# Altium PCB NB2DSK01.PcbDoc (part 15 of 17)
Units mil, origin at the board's own origin, x right, y up, seen from the top; angles counter-clockwise.
Board outline 11815 x 6500.03 mil, 8 copper layers (Top Layer, MidLayer1, MidLayer2, GND, PWR, MidLayer3, MidLayer4, Bottom Layer), stack 74.62 mil thick; 798 components, 1002 nets, 3927 pads, 3182 vias.
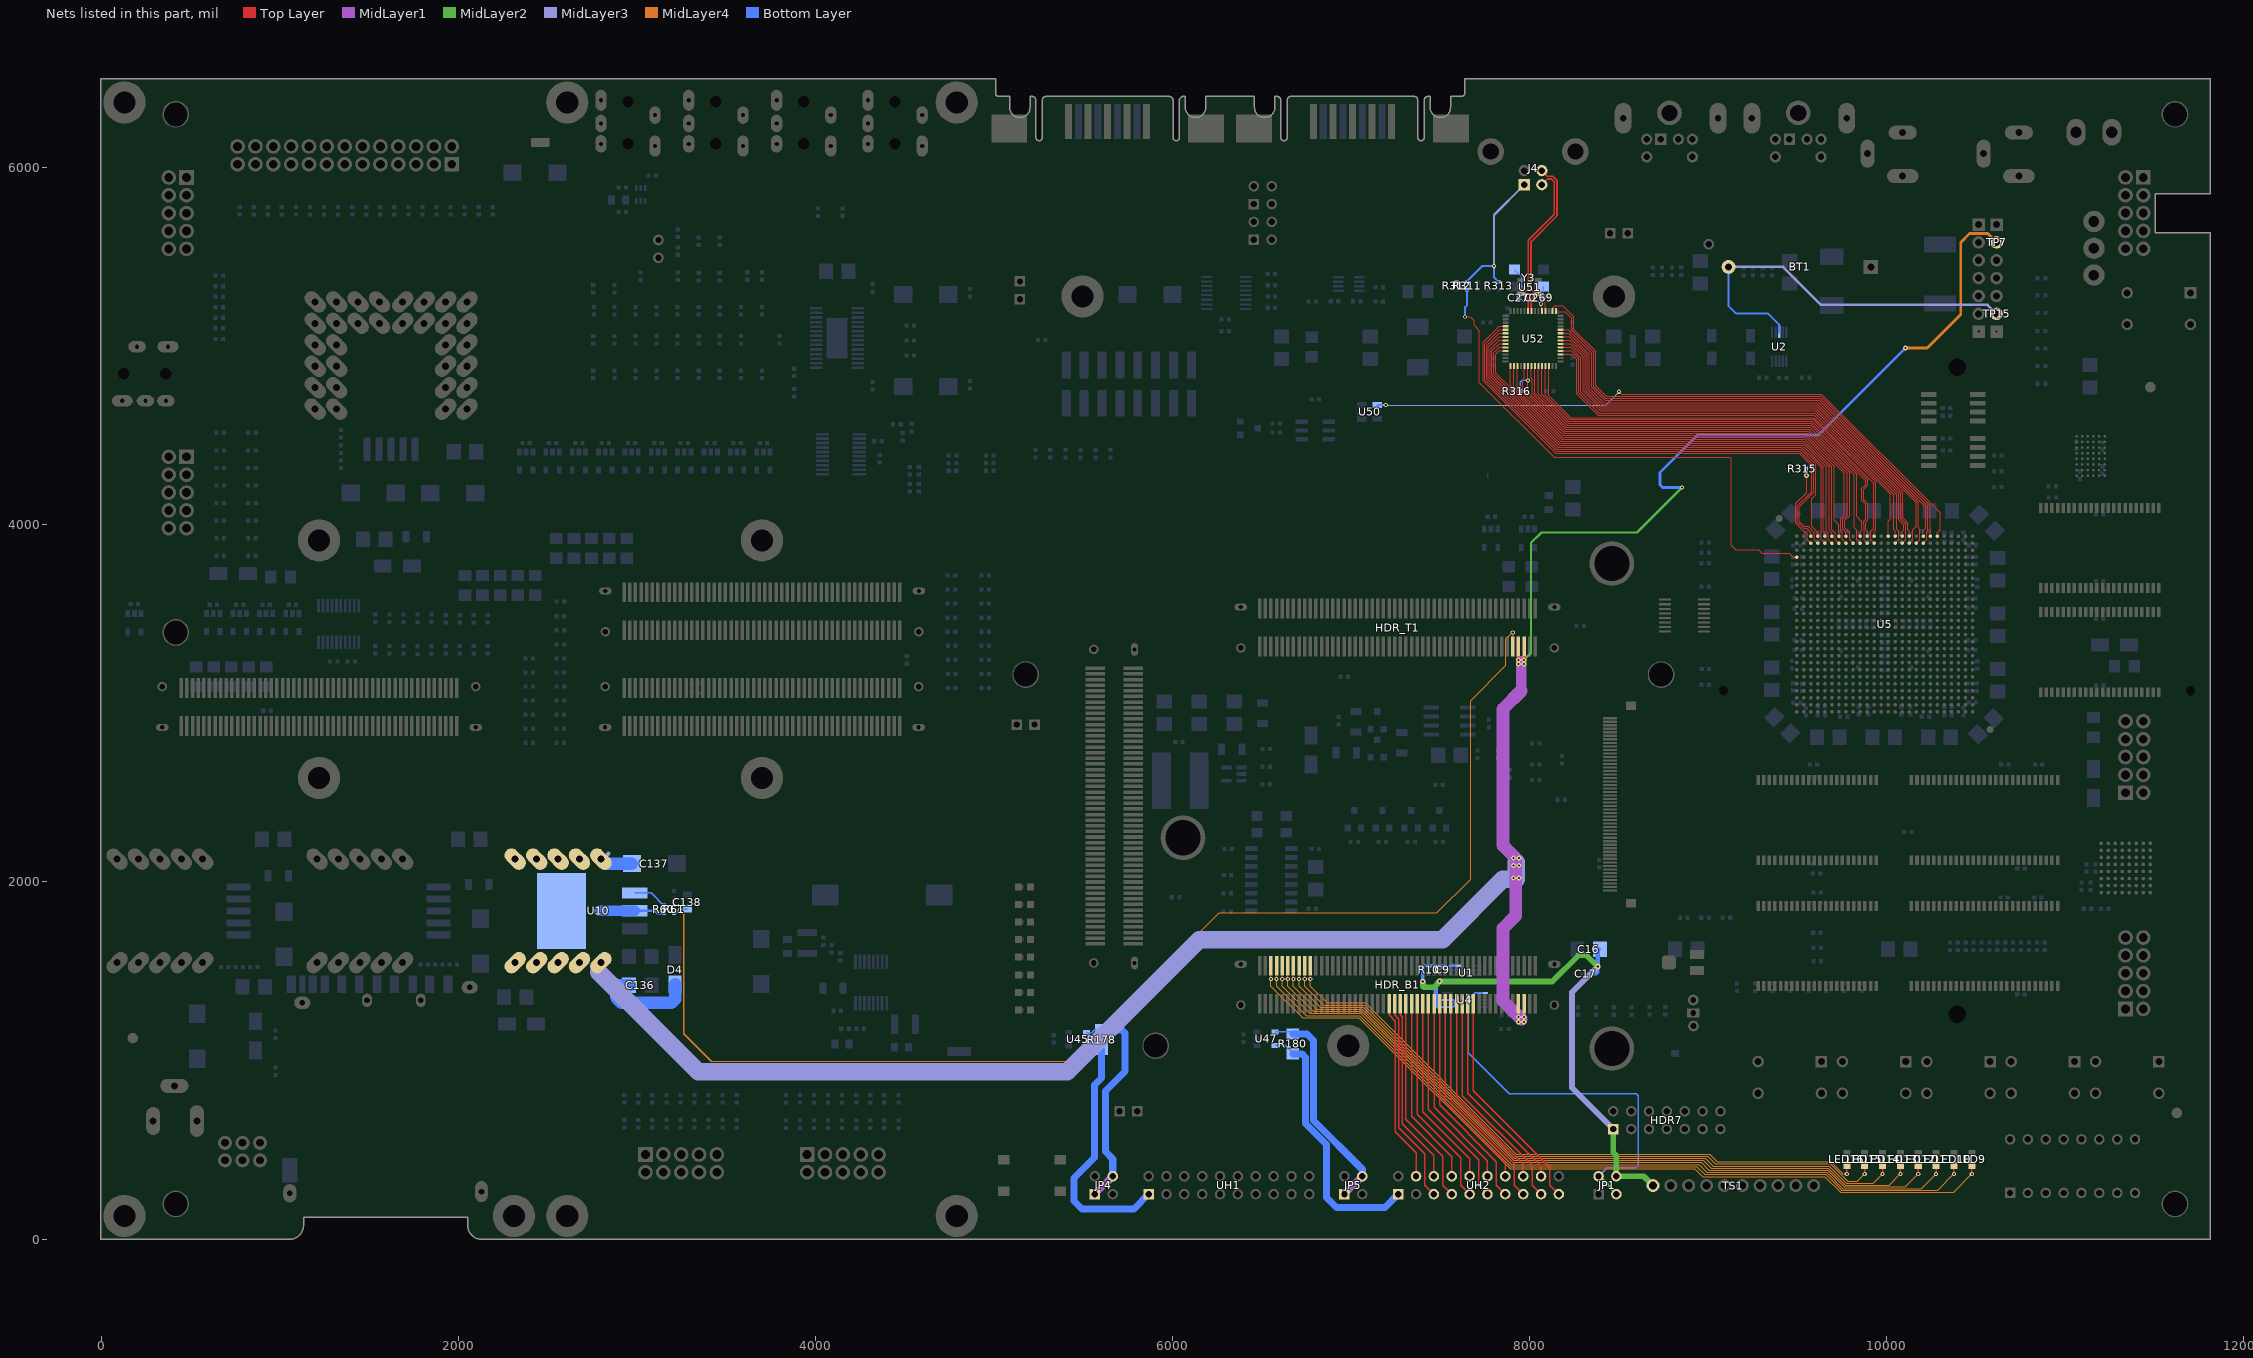
[diagram p21: the nets of this part, all layers, seen from the top]

## Via types
v1: diameter 23.62, hole 11.81, Top Layer to Bottom Layer, tented both sides, 1950 vias
v2: diameter 27.56, hole 11.81, Top Layer to Bottom Layer, tented both sides, 679 vias
v3: diameter 23.62, hole 11.81, Top Layer to Bottom Layer, 194 vias
v4: diameter 31.5, hole 11.81, Top Layer to Bottom Layer, tented both sides, 178 vias
v5: diameter 21.65, hole 11.81, Top Layer to Bottom Layer, tented both sides, 67 vias
v6: diameter 23.62, hole 11.81, Top Layer to Bottom Layer, tented bottom, 53 vias
v7: diameter 26, hole 11.81, Top Layer to Bottom Layer, tented both sides, 21 vias
v8: diameter 26, hole 11.81, Top Layer to Bottom Layer, 13 vias
v9: diameter 28, hole 11.81, Top Layer to Bottom Layer, 8 vias
v10: diameter 25.59, hole 11.81, Top Layer to Bottom Layer, tented both sides, 7 vias
v11: diameter 39.37, hole 11.81, Top Layer to Bottom Layer, tented both sides, 5 vias
v12: diameter 30, hole 11.81, Top Layer to Bottom Layer, 3 vias
v13: diameter 30, hole 11.81, Top Layer to Bottom Layer, tented both sides, 2 vias
v14: diameter 23, hole 11.81, Top Layer to Bottom Layer, tented both sides, 1 vias
v15: diameter 26.56, hole 11.81, Top Layer to Bottom Layer, tented both sides, 1 vias

## Nets (pads, with @x,y where several pads share a name; then routed paths per layer and width w, separated by ;. In a path a pad name is that pad's centre, name@x,y a point inside that pad or via, vN(x,y) a via of type N, cw(c..) or ccw(c..) an arc to the next point about the centre after c; other vN are vias at no path point) (continued)
UIO.IO20: HDR_B1.47 UH2.4 | length 1029.5
  Top Layer w7.87: HDR_B1.47@7212.6,1318.9 7212.6,1255.91 7248.03,1220.47 7248.03,600.19 7363.78,484.44 UH2.4@7363.78,351.97
UIO.IO21: HDR_B1.49 UH2.5 | length 1157.9
  Top Layer w7.87: HDR_B1.49@7244.09,1318.9 7244.09,1255.91 7267.72,1232.28 7267.72,623.82 7413.78,477.75 7413.78,301.97 UH2.5@7463.78,251.97
UIO.IO22: HDR_B1.51 UH2.6 | length 1044.9
  Top Layer w7.87: HDR_B1.51@7275.59,1318.9 7275.59,1255.91 7287.4,1244.1 7287.4,647.44 7463.78,471.06 UH2.6@7463.78,351.97
UIO.IO23: HDR_B1.53 UH2.7 | length 1173.3
  Top Layer w7.87: HDR_B1.53@7307.09,1318.9 7307.09,671.06 7513.78,464.37 7513.78,301.97 UH2.7@7563.78,251.97
UIO.IO24: HDR_B1.55 UH2.8 | length 1060.2
  Top Layer w7.87: HDR_B1.55@7338.58,1318.9 7338.58,686.81 7563.78,461.61 UH2.8@7563.78,351.97
UIO.IO25: HDR_B1.57 UH2.9 | length 1188.6
  Top Layer w7.87: HDR_B1.57@7370.08,1318.9 7370.08,699.85 7613.78,456.15 7613.78,301.97 UH2.9@7663.78,251.97
UIO.IO26: HDR_B1.59 UH2.10 | length 1075.5
  Top Layer w7.87: HDR_B1.59@7401.58,1318.9 7401.58,712.9 7663.78,450.7 UH2.10@7663.78,351.97
UIO.IO27: HDR_B1.61 UH2.11 | length 1203.9
  Top Layer w7.87: HDR_B1.61@7433.07,1318.9 7433.07,725.95 7713.78,445.24 7713.78,301.97 UH2.11@7763.78,251.97
UIO.IO28: HDR_B1.63 UH2.12 | length 1090.9
  Top Layer w7.87: HDR_B1.63@7464.57,1318.9 7464.57,738.99 7763.78,439.78 UH2.12@7763.78,351.97
UIO.IO29: HDR_B1.65 UH2.13 | length 1219.2
  Top Layer w7.87: HDR_B1.65@7496.06,1318.9 7496.06,752.04 7813.78,434.32 7813.78,301.97 UH2.13@7863.78,251.97
UIO.IO30: HDR_B1.67 UH2.14 | length 1106.2
  Top Layer w7.87: HDR_B1.67@7527.56,1318.9 7527.56,765.08 7863.78,428.86 UH2.14@7863.78,351.97
UIO.IO31: HDR_B1.69 UH2.15 | length 1234.6
  Top Layer w7.87: HDR_B1.69@7559.06,1318.9 7559.06,778.13 7913.78,423.41 7913.78,301.97 UH2.15@7963.78,251.97
UIO.IO32: HDR_B1.71 UH2.16 | length 1121.5
  Top Layer w7.87: HDR_B1.71@7590.55,1318.9 7590.55,791.18 7774.45,607.27 7963.78,417.95 UH2.16@7963.78,351.97
UIO.IO33: HDR_B1.73 UH2.17 | length 1249.9
  Top Layer w7.87: HDR_B1.73@7622.05,1318.9 7622.05,804.22 8013.78,412.49 8013.78,301.97 UH2.17@8063.78,251.97
UIO.IO34: HDR_B1.75 UH2.18 | length 1136.9
  Top Layer w7.87: HDR_B1.75@7653.54,1318.9 7653.54,817.27 8063.78,407.03 UH2.18@8063.78,351.97
UIO.IO35: HDR_B1.77 UH2.19 | length 1265.8
  Top Layer w7.87: HDR_B1.77@7685.04,1318.9 7685.04,830.32 8113.78,401.58 8113.78,401.18 ; 8114.17,401.58 8113.78,401.18 ; UH2.19@8163.78,251.97 8113.78,301.97 8113.78,401.18
USB#.DMINUS: J4.2 U51.6 U52.9 | length 889.6
  Top Layer w9.84: U51.6@7968.5,5288.39 7992.13,5264.76 7992.13,5218.37 7990.16,5216.4 U52.9@7990.15,5197.78 U52.9@7990.16,5193.9 ; U51.6@7968.5,5296.26 7992.13,5319.88 7992.13,5593.34 8137.8,5739.01 8137.8,5921.26 8122.05,5937.01 8100,5937.01 J4.2@8068.11,5905.12
USB#.DPLUS: J4.3 U51.1 U52.8 | length 915.5
  Top Layer w9.84: U52.8@8009.84,5193.9 U52.8@8009.84,5197.78 8009.84,5216.4 8007.97,5218.27 8007.97,5264.86 U51.1@8031.5,5288.39 ; U51.1@8031.5,5296.26 8007.97,5319.78 8007.97,5586.71 8153.69,5732.43 8153.69,5927.84 8128.77,5952.76 8099.21,5952.76 J4.3@8068.11,5983.86
USB#.VBUS: J4.1 R311.2 R313.1 | length 816.6
  MidLayer3 w11.81: v1(7800,5448.82) 7800,5735.43 J4.1@7969.69,5905.12
  Bottom Layer w11.81: R311.2@7651.56,5359.75 7651.56,5367.38 7733,5448.82 v1(7800,5448.82) 7800,5386.78 R313.1@7827.02,5359.75
USB.D0: U5.A3 U52.18 | length 2886.5
  Top Layer w5: U52.18@7869.09,5112.2 7865.35,5112.2 7828.74,5112.2 7739,5022.46 7739,4808.25 8146.35,4400.9 9508.55,4400.9 9578.74,4330.71 9578.74,4184.74 9500,4106 9500,4014.14 9533.83,3980.32 9551.18,3980.32 9574.8,3956.69 U5.A3@9574.8,3937.01
USB.D1: U5.B4 U52.19 | length 2919
  Top Layer w5: U52.19@7869.09,5092.52 7865.35,5092.52 7828.74,5092.52 7749,5012.78 7749,4813.99 8150.96,4412.04 9513.16,4412.04 9590.55,4334.65 9590.55,4182.41 9510,4101.86 9510,4018.29 9537.29,3991 9560.18,3991 9594.49,3956.69 9594.49,3917.32 U5.B4@9614.17,3897.64
USB.D2: U5.A4 U52.20 | length 2791
  Top Layer w5: U52.20@7869.09,5072.83 7865.35,5072.83 7828.74,5072.83 7759,5003.09 7759,4819.74 8155.57,4423.17 9517.77,4423.17 9602.36,4338.58 9602.36,4169.29 9578.74,4145.67 9578.74,4019.69 9578.74,4000 9578.74,3992.13 9614.17,3956.69 U5.A4@9614.17,3937.01
USB.D3: U5.B5 U52.21 | length 2799.2
  Top Layer w5: U52.21@7869.09,5053.15 7865.35,5053.15 7828.74,5053.15 7769,4993.41 7769,4825.49 8160.18,4434.31 9522.39,4434.31 9604.29,4352.4 9614.17,4342.52 9633.86,4322.84 9633.86,4019.69 9633.86,4000 9633.86,3917.32 U5.B5@9653.54,3897.64
USB.D4: U5.A5 U52.22 | length 2731.8
  Top Layer w5: U52.22@7869.09,5033.46 7865.35,5033.46 7828.74,5033.46 7779,4983.72 7779,4831.24 8164.8,4445.44 9527,4445.44 9645.67,4326.77 9645.67,4019.69 9645.67,4000 9645.67,3964.57 9653.54,3956.69 U5.A5@9653.54,3937.01
USB.D5: U5.B6 U52.23 | length 2759.5
  Top Layer w5: U52.23@7869.09,5013.78 7865.35,5013.78 7828.74,5013.78 7789,4974.04 7789,4836.98 8169.41,4456.58 9531.61,4456.58 9661.42,4326.77 9661.42,4019.69 9661.42,4000 9661.42,3968.5 9673.23,3956.69 9673.23,3917.32 U5.B6@9692.91,3897.64
USB.D6: U5.A6 U52.24 | length 2692.2
  Top Layer w5: U52.24@7869.09,4994.09 7865.35,4994.09 7828.74,4994.09 7799,4964.35 7799,4842.73 8174.02,4467.71 9536.22,4467.71 9677.17,4326.77 9677.17,4019.69 9677.17,4000 9677.17,3972.44 9692.91,3956.69 U5.A6@9692.91,3937.01
USB.D7: U5.B7 U52.25 | length 2719.9
  Top Layer w5: U52.25@7869.09,4974.41 7865.35,4974.41 7828.74,4974.41 7809,4954.67 7809,4848.48 8178.63,4478.85 9540.84,4478.85 9692.91,4326.77 9692.91,4019.69 9692.91,4000 9692.91,3972.44 9712.6,3952.76 9712.6,3917.32 U5.B7@9732.28,3897.64
USB.D8: U5.A15 U52.45 | length 2542.4
  Top Layer w5: U52.45@8170.28,4954.72 8174.01,4954.72 8236.51,4954.72 8263.78,4927.45 8263.78,4735.5 8385.1,4614.17 9594.49,4614.17 10039.37,4169.29 10039.37,4015.75 10039.37,4000 10039.37,3972.44 10047.24,3964.57 U5.A15@10047.24,3937.01
USB.D9: U5.B15 U52.46 | length 2615.5
  Top Layer w5: U52.46@8170.28,4974.41 8174.01,4974.41 8233.53,4974.41 8275.59,4932.35 8275.59,4740.39 8390,4625.98 9598.43,4625.98 10055.12,4169.29 10055.12,4015.75 10055.12,4000 10055.12,3976.38 10066.93,3964.57 10066.93,3917.32 U5.B15@10047.24,3897.64
USB.D10: U5.A16 U52.47 | length 2600
  Top Layer w5: U52.47@8170.28,4994.09 8174.01,4994.09 8230.55,4994.09 8287.4,4937.24 8287.4,4745.28 8394.89,4637.8 9602.36,4637.8 10066.68,4173.48 10066.68,4029.69 10094.49,4001.89 10094.49,3972.44 10086.61,3964.57 U5.A16@10086.61,3937.01
USB.D11: U5.B16 U52.48 | length 2666.5
  Top Layer w5: U52.48@8170.28,5013.78 8174.01,5013.78 8227.57,5013.78 8299.21,4942.13 8299.21,4750.17 8399.78,4649.61 9606.3,4649.61 10060.41,4195.5 10077.68,4178.23 10077.68,4035.45 10106.3,4006.83 10106.3,3917.32 U5.B16@10086.61,3897.64
USB.D12: U5.A17 U52.49 | length 2644.6
  Top Layer w5: U52.49@8170.28,5033.46 8174.01,5033.46 8224.58,5033.46 8311.02,4947.02 8311.02,4755.07 8404.67,4661.42 9610.24,4661.42 10088.68,4182.97 10088.68,4038.93 10118.11,4009.5 10118.11,3972.44 10125.98,3964.57 U5.A17@10125.98,3937.01
USB.D13: U5.B17 U52.50 | length 2733.4
  Top Layer w5: U52.50@8170.28,5053.15 8174.01,5053.15 8221.6,5053.15 8322.83,4951.92 8322.83,4759.96 8409.56,4673.23 9614.17,4673.23 10164.68,4122.72 10164.68,3991.45 10145.67,3972.44 10145.67,3917.32 U5.B17@10125.98,3897.64
USB.D14: U5.B18 U52.51 | length 2751.8
  Top Layer w5: U52.51@8170.28,5072.83 8174.01,5072.83 8218.62,5072.83 8334.65,4956.81 8334.65,4764.85 8414.46,4685.04 9618.11,4685.04 10175.32,4127.84 10175.32,3983.47 10185.68,3973.1 10185.68,3917.97 U5.B18@10165.35,3897.64
USB.D15: U5.A19 U52.52 | length 2741.7
  Top Layer w5: U52.52@8170.28,5092.52 8174.01,5092.52 8216.54,5092.52 8347.09,4961.96 8347.09,4770.01 8420.25,4696.85 9622.05,4696.85 10219.68,4099.22 10219.68,3981.87 10204.72,3966.91 U5.A19@10204.72,3937.01
USB.FIFOADR0: U5.A11 U52.37 | length 2538
  Top Layer w5: U52.37@8049.21,4885.24 8049.21,4734.25 8215.53,4567.93 9577.74,4567.93 9893.7,4251.97 9893.7,4223.67 9870,4199.97 9870,4141.14 9893.7,4117.44 9893.7,4027.56 9881.89,4015.75 9881.89,4000 9881.89,3972.44 9889.76,3964.57 U5.A11@9889.76,3937.01
USB.FIFOADR1: U5.B12 U52.38 | length 2570.6
  Top Layer w5: U52.38@8068.9,4885.24 8068.9,4730.32 8220.14,4579.07 9582.35,4579.07 9927.01,4234.41 9927.01,3982.13 9921.26,3976.38 9909.45,3964.57 9909.45,3917.32 U5.B12@9929.13,3897.64
USB.FIFOADR2: U5.B11 U52.36 | length 2584
  Top Layer w5: U52.36@8029.53,4885.24 8029.53,4738.19 8210.92,4556.8 9573.12,4556.8 9881.89,4248.03 9881.89,4226 9860,4204.11 9860,4137 9881.89,4115.11 9881.89,4031.5 9870.08,4019.69 9870.08,4000 9870.08,3917.32 U5.B11@9889.76,3897.64
USB.FLAGA: U5.A7 U52.29 | length 2508.6
  Top Layer w5: U52.29@7891.73,4885.24 7891.73,4781.5 8183.25,4489.98 9545.45,4489.98 9706.68,4328.75 9706.68,4025.6 9732.28,4000 U5.A7@9732.28,3937.01
USB.FLAGB: U5.B8 U52.30 | length 2571
  Top Layer w5: U52.30@7911.42,4885.24 7911.42,4777.56 8187.86,4501.12 9550.06,4501.12 9761.69,4289.49 9761.69,4055.47 9743.68,4037.45 9743.68,3968.45 9751.97,3960.17 9751.97,3917.32 U5.B8@9771.65,3897.64
USB.FLAGC: U5.A8 U52.31 | length 2528.5
  Top Layer w5: U52.31@7931.1,4885.24 7931.1,4773.62 8192.47,4512.26 9554.67,4512.26 9777.68,4289.25 9777.68,4054.45 9753.68,4030.45 9753.68,3977.32 9771.65,3959.34 U5.A8@9771.65,3937.01
USB.FLAGD_CS_N: U5.A14 U52.40 | length 2542.8
  Top Layer w5: U52.40@8108.27,4885.24 8108.27,4722.44 8229.37,4601.34 9591.57,4601.34 10019.69,4173.23 10019.69,4031.5 10007.87,4019.69 10007.87,4015.75 10007.87,4000 U5.A14@10007.87,3937.01
USB.IFCLK: R315.1 U5.B3 | length 478.8
  Top Layer w5: v2(9551.18,4275.59) 9551.18,4181.1 9490,4119.92 9490,4010 9535.43,3964.57 9555.12,3944.88 9555.12,3917.32 U5.B3@9574.8,3897.64
  Bottom Layer w5: R315.1@9548.72,4314.95 9548.72,4297.62 9551.18,4295.16 v2(9551.18,4275.59)
USB.INT_N: R316.1 U5.B10 U52.34 | length 2653.3
  Top Layer w5: U52.34@7990.16,4885.24 v1(7990.16,4809.05) 7990.16,4746.06 8201.69,4534.53 9563.9,4534.53 9818.9,4279.53 9818.9,4019.69 9818.9,4000 9818.9,3985.04 9832.68,3971.26 9832.68,3915.35 U5.B10@9850.39,3897.64
  Bottom Layer w7.87: R316.1@7948.35,4748.03 7948.35,4799.5 7957.9,4809.05 v1(7990.16,4809.05)
USB.PKTEND: U5.A12 U52.39 | length 2515.1
  Top Layer w5: U52.39@8088.58,4885.24 8088.58,4726.38 8224.76,4590.2 9586.96,4590.2 9937.01,4240.16 9937.01,4015.75 9937.01,4000 9937.01,3972.44 9929.13,3964.57 U5.A12@9929.13,3937.01
USB.RD_N: U5.B19 U52.1 | length 2904.4
  Top Layer w5: U52.1@8147.64,5193.9 8199.8,5193.9 8236.22,5157.48 8236.22,5088.64 8358.27,4966.59 8358.27,4774.64 8424.24,4708.66 9625.98,4708.66 10230.68,4103.97 10230.68,3967.68 10224.41,3961.41 10224.41,3917.32 U5.B19@10204.72,3897.64
USB.READY: U5.B9 U52.33 | length 2579
  Top Layer w5: U52.33@7970.47,4885.24 7970.47,4820.87 7960.63,4811.02 7960.63,4759.84 8197.08,4523.39 9559.29,4523.39 9791.34,4291.34 9791.34,4052.46 9763.68,4024.8 9763.68,3983.45 9791.34,3955.8 9791.34,3917.32 U5.B9@9811.02,3897.64
USB.RESET_N: U5.A21 U50.3 | length 3601.2
  Top Layer w5: v1(8501,4746) 8514.72,4732.28 9633.86,4732.28 10299.21,4066.93 10299.21,4015.75 10299.21,4000 10299.21,3972.44 10283.46,3956.69 U5.A21@10283.46,3937.01
  MidLayer3 w5: v1(7194.1,4670.93) 8425.93,4670.93 v1(8501,4746)
  Bottom Layer w11.81: U50.3@7146.86,4670.93 v1(7194.1,4670.93)
USB.SLOE: U5.A10 U52.35 | length 2516.3
  Top Layer w5: U52.35@8009.84,4885.24 8009.84,4820.87 8015.75,4814.96 8015.75,4736.22 8206.31,4545.66 9568.51,4545.66 9830.71,4283.47 9830.71,4047.24 9858.27,4019.69 9859.74,4018.21 9859.74,3973.92 9850.39,3964.57 U5.A10@9850.39,3937.01
USB.VBUS: R311.1 R312.1 U5.D1 | length 3121.5
  Top Layer w5: v5(7637.8,5165.36) 7666.64,5165.36 7688.68,5143.32 7688.68,5117 7719,5086.68 7719,4796.75 8137.8,4377.95 9123.15,4377.95 9130,4371.1 9130,3885.1 9155.1,3860 9282,3860 9299.48,3842.52 9417.32,3842.52 9433.07,3842.52 9452.76,3842.52 9476.38,3818.9 U5.D1@9496.06,3818.9
  Bottom Layer w5: R311.1@7649.66,5317.39 R311.1@7651.56,5317.39
  Bottom Layer w11.81: R312.1@7590.54,5359.75 7632.9,5317.39 R311.1@7649.66,5317.39 7649.66,5230.68 7637.8,5218.82 v5(7637.8,5165.36)
USB.WR_N: U5.A20 U52.2 | length 2923.7
  Top Layer w5: U52.2@8127.95,5201.38 8127.95,5214.57 8141.84,5228.45 8184.93,5228.45 8248.03,5165.36 8248.03,5093.53 8370.08,4971.49 8370.08,4779.53 8429.13,4720.47 9629.92,4720.47 10244.09,4106.3 10244.09,4015.75 10244.09,4000 U5.A20@10244.09,3937.01
USB.XTALIN: C270.1 U52.5 Y3.3 | length 362.4
  Top Layer w5: v1(8063.39,5238.58) 8063.39,5221.28 8068.9,5215.77 8068.9,5197.78 U52.5@8068.9,5193.9
  Bottom Layer w5: Y3.3@7914.56,5430.19 7955.71,5389.05 7955.71,5300 7938.94,5283.24 C270.1@7938.94,5272.46 ; C270.1@7943.69,5272.46 7963,5253.15 8048.82,5253.15 v1(8063.39,5238.58)
USB.XTALOUT: C269.1 U52.4 Y3.1 | length 202.9
  Top Layer w5: U52.4@8088.58,5193.9 U52.4@8088.58,5197.78 8088.58,5271.58 v1(8106,5289)
  Bottom Layer w5: Y3.1@8077.56,5335.19 8075.79,5333.42 C269.1@8075.79,5272.46 8092.33,5289 v1(8106,5289)
USER_LED.L0: HDR_B1.6 LED9.1 | length 4607.1
  Top Layer w5: v1(6551.18,1456.69) HDR_B1.6@6551.18,1531.5
  Top Layer w7.87: v1(10476.38,365.24) LED9.1@10476.38,412.48
  MidLayer4 w5: v1(6551.18,1456.69) 6551.18,1417.32 6728.35,1240.16 7043.65,1240.16 7890.11,393.7 8925.2,393.7 8968.5,350.39 9653.54,350.39 9740.94,263 10374.14,263 v1(10476.38,365.24)
USER_LED.L1: HDR_B1.8 LED10.1 | length 4467.3
  Top Layer w5: v1(6582.68,1456.69) HDR_B1.8@6582.68,1531.5
  Top Layer w7.87: v1(10376.38,365.24) LED10.1@10376.38,412.48
  MidLayer4 w5: v1(6582.68,1456.69) 6582.68,1417.32 6748.03,1251.97 7048.55,1251.97 7895,405.51 8937.01,405.51 8980.32,362.21 9658.44,362.21 9747.64,273 10284.14,273 v1(10376.38,365.24)
USER_LED.L2: HDR_B1.10 LED11.1 | length 4327.5
  Top Layer w5: v1(6614.17,1456.69) HDR_B1.10@6614.17,1531.5
  Top Layer w7.87: v1(10276.38,365.24) LED11.1@10276.38,412.48
  MidLayer4 w5: v1(6614.17,1456.69) 6614.17,1417.32 6767.72,1263.78 7053.44,1263.78 7899.9,417.32 8948.82,417.32 8992.13,374.02 9663.33,374.02 9754.34,283 10194.14,283 v1(10276.38,365.24)
USER_LED.L3: HDR_B1.12 LED12.1 | length 4187.8
  Top Layer w5: v1(6645.67,1456.69) HDR_B1.12@6645.67,1531.5
  Top Layer w7.87: v1(10176.38,365.24) LED12.1@10176.38,412.48
  MidLayer4 w5: v1(6645.67,1456.69) 6645.67,1417.32 6787.4,1275.59 7058.33,1275.59 7904.79,429.13 8960.63,429.13 9003.94,385.83 9668.22,385.83 9761.05,293 10104.14,293 v1(10176.38,365.24)
USER_LED.L4: HDR_B1.14 LED13.1 | length 4048
  Top Layer w5: v1(6677.16,1456.69) HDR_B1.14@6677.16,1531.5
  Top Layer w7.87: v1(10076.38,365.24) LED13.1@10076.38,412.48
  MidLayer4 w5: v1(6677.16,1456.69) 6677.16,1417.32 6807.09,1287.4 7063.22,1287.4 7909.68,440.95 8972.44,440.95 9015.75,397.64 9673.11,397.64 9767.75,303 10014.14,303 v1(10076.38,365.24)
USER_LED.L5: HDR_B1.16 LED14.1 | length 3908.2
  Top Layer w5: v1(6708.66,1456.69) HDR_B1.16@6708.66,1531.5
  Top Layer w7.87: v1(9976.38,365.24) LED14.1@9976.38,412.48
  MidLayer4 w5: v1(6708.66,1456.69) 6708.66,1417.32 6826.77,1299.21 7068.12,1299.21 7914.57,452.76 8984.25,452.76 9027.56,409.45 9678,409.45 9774.45,313 9924.14,313 v1(9976.38,365.24)
USER_LED.L6: HDR_B1.18 LED15.1 | length 3768.4
  Top Layer w5: v1(6740.16,1456.69) HDR_B1.18@6740.16,1531.5
  Top Layer w7.87: v1(9876.38,365.24) LED15.1@9876.38,412.48
  MidLayer4 w5: v1(6740.16,1456.69) 6740.16,1417.32 6846.46,1311.02 7073.01,1311.02 7919.47,464.57 8996.06,464.57 9039.37,421.26 9682.9,421.26 9781.16,323 9834.14,323 v1(9876.38,365.24)
USER_LED.L7: HDR_B1.20 LED16.1 | length 3601.9
  Top Layer w5: v1(6771.65,1456.69) HDR_B1.20@6771.65,1531.5
  Top Layer w7.87: v1(9776.38,365.24) LED16.1@9776.38,412.48
  MidLayer4 w5: v1(6771.65,1456.69) 6771.65,1417.32 6866.14,1322.84 7077.9,1322.84 7924.36,476.38 9007.87,476.38 9051.18,433.07 9685.23,433.07 9753.06,365.24 v1(9776.38,365.24)
USERPOWER.AOUT: R178.2 U45.5 UH1.1 | length 1466.9
  Bottom Layer w7.87: U45.5@5519.41,1082.08 5547.33,1082.08 5559.14,1070.27 R178.2@5598.51,1070.27
  Bottom Layer w40: R178.2@5602.45,1062.39 5602.45,903 5563,863.55 5563,457.18 5448.82,343 5448.82,212.6 5492.13,169.29 5783.46,169.29 UH1.1@5866.14,251.97
USERPOWER.BOUT: R180.2 U47.5 UH2.1 | length 1489.2
  Bottom Layer w7.87: U47.5@6575,1085.1 6634.42,1085.1 R180.2@6677.72,1041.8
  Bottom Layer w39.37: R180.2@6673.79,1037.86 6724.14,1037.86 6744.63,1017.37 6744.63,646.62 6862.2,529.05 6862.2,232.28 6917.32,177.17 7188.98,177.17 UH2.1@7263.78,251.97
V_USERA: JP4.1 JP4.4 R178.1 U45.4 | length 1233.5
  MidLayer1 w40: JP4.1@5565.12,251.81 JP4.4@5665.12,351.81
  Bottom Layer w7.87: U45.4@5519.41,1157.08 5547.53,1157.08 5563.08,1172.63 R178.1@5602.45,1172.63
  Bottom Layer w40: R178.1@5602.45,1172.63 5714.37,1172.63 5733,1154 5733,939 5624,830 5624,490.17 5665.12,449.06 JP4.4@5665.12,351.81
V_USERB: JP5.1 JP5.4 R180.1 U47.4 | length 1244.3
  MidLayer1 w40: JP5.1@6962.76,251.81 JP5.4@7062.76,351.81
  Bottom Layer w7.87: U47.4@6575,1160.1 R180.1@6673.59,1160.1
  Bottom Layer w39.37: R180.1@6673.79,1148.09 6753.91,1148.09 6789,1113 6789,665 7062.76,391.24 JP5.4@7062.76,351.81
VBATT: BT1.1 TP15.1 U2.3 | length 2198.2
  MidLayer3 w15: BT1.1@9114.17,5444.88 9419.12,5444.88 9632,5232 10564.91,5232 TP15.1@10614.94,5181.97
  Bottom Layer w11.81: BT1.1@9114.17,5444.88 9114.17,5225.28 9154.56,5184.89 9332.77,5184.89 9397.66,5120 U2.3@9397.66,5078.18
VCCA: C9.1 C16.1 C17.1 HDR7.1 JP1.4 R10.1 TS1.1 U1.8 U4.1 U4.3 | length 4153.4
  MidLayer2 w31.5: v13(7401.5,1443) 7401.5,1427.42 ; v4(8381.13,1526.54) 8318.7,1588.97 8272.72,1588.97 8127.75,1444 ; HDR7.1@8468.5,616.54 8468.5,485.5 8485.83,468.17 JP1.4@8485.83,351.97 8638.7,351.97 TS1.1@8690.67,300 ; 7401.5,1427.42 7417.62,1411.3 ; 7401.5,1427.42 7401.5,1416.1 7406.3,1411.3 7417.62,1411.3 ; 7417.62,1411.3 7463.3,1411.3 ; 7463.3,1411.3 7467.82,1411.3 7498.26,1441.74 8125.49,1441.74 8127.75,1444 ; 7463.3,1411.3 v4(7496,1444) 8127.75,1444
  MidLayer3 w31.5: v4(8381.13,1526.54) 8237.3,1382.72 8237.3,847.74 HDR7.1@8468.5,616.54
  Bottom Layer w7.87: U4.1@7539.38,1300.01 7576.01,1300.01 7579,1303 7579,1335 7574.62,1339.38 U4.3@7539.38,1339.38
  Bottom Layer w12: 7481.91,1305.09 7486.99,1300.01 U4.1@7539.38,1300.01 ; C9.1@7515.53,1530.45 U1.8@7586.54,1530.45
  Bottom Layer w15.75: C17.1@8334.87,1485.2 C17.1@8339.79,1485.2
  Bottom Layer w19.68: C17.1@8334.87,1485.2 8372.83,1485.2 8381.13,1493.5 v4(8381.13,1526.54) ; C16.1@8381.13,1615.13 C16.1@8389,1623
  Bottom Layer w20: v13(7401.5,1443) 7401.5,1522.5 7409.45,1530.45 7436.99,1530.45 7514.54,1530.45 C9.1@7515.53,1530.45
  Bottom Layer w23.62: v4(8381.13,1526.54) C16.1@8381.13,1615.13
  Bottom Layer w25: 7481.91,1305.09 7473,1314 7473,1421 v4(7496,1444)
VCCX: C136.1 C137.1 D4.1 HDR_B1.93 HDR_B1.95 HDR_T1.93 HDR_T1.95 pad.0@2318.68,1548.45 pad.0@2318.68,2128.45 pad.0@2438.68,1548.45 pad.0@2438.68,2128.45 pad.0@2558.68,1548.45 pad.0@2558.68,2128.45 pad.0@2678.68,1548.45 pad.0@2678.68,2128.45 pad.0@2798.68,1548.45 pad.0@2798.68,2128.45 R60.1 TP7.1 U10.2 U10.4 | length 14256.5
  Top Layer w19.68: v2(7937.01,3244.1) HDR_T1.93@7937.01,3318.9 ; v2(7968.5,3244.1) HDR_T1.95@7968.5,3318.9
  Top Layer w25: v2(7937.01,3220.47) v2(7937.01,3244.1) ; v2(7968.5,3220.47) v2(7968.5,3244.1)
  MidLayer1 w23.62: v2(7937.01,1244.1) v2(7937.01,1216.54) v2(7968.5,1216.54) v2(7968.5,1244.1) ; v2(7937.01,3220.47) v2(7937.01,3244.1) 7937.01,3248.03 7968.5,3248.03 v2(7968.5,3244.1) v2(7968.5,3220.47)
  MidLayer1 w59.06: 7952.76,3070.87 7952.76,3220.47 7952.76,3236.22
  MidLayer1 w70.87: 7952.76,1232.28 7938.98,1246.06 7850.39,1334.65 7850.39,1740.16 7921.26,1811.02 7921.26,2023.45 7921.26,2093.45 7921.26,2133.86 7915.36,2139.76 7850.39,2204.73 7850.39,2968.5 7952.76,3070.87
  MidLayer2 w12: v2(7968.5,3244.1) 8006.87,3282.46 8006.87,3898.24 8066.36,3957.73 8601.02,3957.73 v1(8852.79,4209.5)
  MidLayer4 w15.75: v2(10105,4990) 10226.52,4990 10414.6,5178.08 10414.6,5548.6 10414.6,5581.6 10464,5631 10565.91,5631 TP7.1@10614.94,5581.97
  MidLayer3 w22: pad.0@2807.09,2124.41 2841.84,2159.17 ; 2887.8,1398.8 2890.13,1401.13
  MidLayer3 w98.43: pad.0@2787.4,1494.49 3343.44,938.45 5410.9,938.45 6149.61,1677.17 7511.81,1677.17 7850.39,2015.75 7908.68,2015.75 7925.2,2015.75 7925.2,2023.45 7925.2,2093.45 7925.2,2110.24
  Bottom Layer w15.75: U10.2@2988.68,1838.45 3100.29,1838.45 3113.07,1825.67 R60.1@3151.97,1825.67 ; v1(8852.79,4209.5) 8745.5,4209.5 8730,4225 8730,4293.63 8939.24,4502.87 9617.87,4502.87 v2(10105,4990)
  Bottom Layer w60: 2788.94,1838.45 U10.2@2988.68,1838.45
  Bottom Layer w70: pad.0@2781.81,1517.09 2877.64,1421.26 2883.68,1421.26 ; pad.0@2823.97,2103.16 C137.1@2972.62,2103.18 ; 2883.68,1423.45 2883.68,1421.26 ; C136.1@2960.63,1421.26 C136.1@2956.69,1421.26 2883.68,1421.26 ; D4.1@3213.72,1427.17 3213.72,1344.49 3192.68,1323.45 2913.68,1323.45 2883.68,1353.45 2883.68,1421.26
  other v2: 7908.68,2023.45 7940.18,2023.45 7908.68,2093.45 7940.18,2093.45 7909.45,2133.86 7940.95,2133.86
VCCX_REF: C138.2 HDR_T1.91 R60.2 R61.1 U10.1 | length 7503
  Top Layer w7.87: HDR_T1.91@7905.51,3318.9 v1(7905.51,3397.64)
  MidLayer4 w5: 3417.32,996.06 5430.12,996.06 6260.83,1826.77 7480.32,1826.77 7669.29,2015.75 7669.29,3015.75 7866.14,3212.6 7866.14,3358.27 v1(7905.51,3397.64)
  MidLayer4 w7.87: v1(3239.4,1842.3) 3263.68,1818.02 3263.68,1149.7 3417.32,996.06
  Bottom Layer w7.87: U10.1@2988.68,1938.45 3081.55,1938.45 R60.2@3151.97,1868.03 3193.36,1826.64 R61.1@3208.68,1826.64 3224.34,1826.64 3239.7,1842 3246.14,1848.44 C138.2@3283.56,1848.44
VREF_IN: JP1.2 JP1.3 U4.6 | length 2230.8
  MidLayer2 w7.87: JP1.2@8385.83,351.97 JP1.2@8388.7,351.97 ; JP1.3@8487.26,253.41 JP1.3@8490.67,250
  MidLayer2 w20: JP1.2@8388.7,351.97 JP1.3@8487.26,253.41
  Bottom Layer w7.87: U4.6@7736.23,1378.75 7695,1378.75 7653.07,1336.82 7653.07,1047.6 7885.56,815.11 8597.1,815.11 8608.17,804.05 8608.17,414.17 8594,400 8433.86,400 JP1.2@8385.83,351.97
pads on no net: D2.3 D12.3 DAUGHTER_3XCONN.LPA DAUGHTER_3XCONN.LPB DAUGHTER_3XCONN.LPC FD1.0 FD2.0 FD3.0 HDR4.5 HDR4.8 HDR5.5 HDR5.8 J5.2 J5.6 J6.2 J6.6 J7.1 J7.5 J7.8 J10.12 J10.13 J11.12 J11.13 J12.10 J12.11 J12.12 J12.13 J13.10 J13.12 J13.13 J14.12 J14.13 LCD1.MH1 LCD_COVER.TFT_MOUNT MH1.MOUNT MH2.MOUNT MH3.MOUNT MH4.MOUNT MH5.MOUNT MH6.MOUNT MH7.MOUNT MH8.MOUNT PB_MH1.STAND PB_MH2.STAND PB_MH3.STAND PB_MH4.STAND PB_MH5.STAND PB_MH6.STAND PB_MH7.STAND PB_MH8.STAND PB_MH9.STAND PB_MH10.STAND PB_MH11.STAND PB_MH12.STAND PB_MH13.STAND PB_MH14.STAND SW1.1 SW1.2 SW2.1 SW2.2 SW3.1 SW3.2 SW4.1 SW4.2 SW5.1 SW5.2 U3.2 U3.4 U3.7 U3.10 U3.14 U3.15 U5.A23 U5.AA5 U5.AB14 U5.AB15 U5.AB16 U5.AB17 U5.AE6 U5.AF5 U5.AF12 U5.B20 U5.B21 U5.C13 U5.C22 U5.F8 U5.F15 U5.F22 U5.FID1 U5.H16 U5.H22 U5.L1 U5.P2 U5.P20 U5.R20 U5.T2 U5.T20 U5.U20 U5.U22 U5.V2 U5.V20 U5.V22 U5.W15 U5.W20 U5.W22 U5.Y20 U7.A4 U7.A5 U7.A6 U7.B5 U7.C2 U7.C3 U7.C4 U7.C5 U7.D2 U7.D3 U7.D4 U7.D5 U7.E3 U7.E4 U7.E5 U7.F2 U7.F3 U7.F4 U7.G2 U7.H5 U9.5 U9.8 U17.18 U17.25 U19.3 U19.5 U19.6 U24.A1 U24.A8 U24.B1 U24.B4 U24.C1 U24.D1 U24.E1 U24.F8 U24.G1 U24.G8 U24.H1 U24.H8 U25.40 U26.40 U51.3 U51.4 U52.54 VR2.4 VR2.5 VR2.6 Y1.0
copper on no net: | length 5023.2
  Top Layer w5: v1(11299.21,2196.67) 11318.9,2176.99 ; 8811,5216.37 8839.91,5216.37 ; 8811,5216.37 8810.92,5205.77 8839.91,5216.37 ; 8811,5216.37 8810.92,5226.98 8839.91,5216.37 ; 8799,5190.5 8926,5190.5 8926,5243.5 8799,5243.5 8799,5190.5
  Top Layer w7: 8814.45,5212.13 8824.35,5212.13 ; 8814.45,5220.62 8824.35,5220.62
  Top Layer w7.87: v1(9751.97,3759.84) 9771.65,3740.16 ; 10007.87,3110.24 v1(10027.56,3090.55) ; 10047.24,3110.24 v1(10066.93,3090.55) ; 10047.24,3228.35 v1(10066.93,3208.66) ; 10047.24,3740.16 v1(10066.93,3759.84) ; 10086.61,3110.24 v1(10106.3,3090.55) ; 10086.61,3661.42 v1(10106.3,3681.1) ; 10125.98,3110.24 v1(10145.67,3090.55) ; 10244.09,3188.98 v1(10263.78,3169.29) ; 10244.09,3228.35 v1(10263.78,3208.66) ; 10244.09,3267.72 v1(10263.78,3248.03) ; 10244.09,3307.09 v1(10263.78,3287.4) ; 10244.09,3346.46 v1(10263.78,3326.77) ; 10244.09,3385.83 v1(10263.78,3366.14) ; 10244.09,3425.2 v5@10263.78,3405.51 ; 10322.84,3228.35 v1(10342.52,3208.66) ; 10322.84,3267.72 v1(10342.52,3248.03) ; 10322.84,3307.09 v1(10342.52,3287.4) ; 10322.84,3661.42 v1(10342.52,3681.1) ; 10322.83,3858.27 v1(10342.52,3877.95)
  Top Layer w15.75: 6789.49,6259.84 v1(6789.78,5808.9) ; v1(7226,5808.9) 7226.5,6259.84
  MidLayer1 w5: 8811,5163.37 8839.91,5163.37 ; 8811,5163.37 8810.92,5152.77 8839.91,5163.37 ; 8811,5163.37 8810.92,5173.98 8839.91,5163.37 ; 8799,5137.5 8926,5137.5 8926,5190.5 8799,5190.5 8799,5137.5
  MidLayer1 w7: 8814.45,5159.13 8824.35,5159.13 ; 8814.45,5167.62 8824.35,5167.62
  MidLayer2 w5: v1(10342.52,3681.1) 10362.21,3700.79 10539.37,3700.79 ; 8811,5110.37 8839.91,5110.37 ; 8811,5110.37 8810.92,5099.77 8839.91,5110.37 ; 8811,5110.37 8810.92,5120.98 8839.91,5110.37 ; 8799,5084.5 8926,5084.5 8926,5137.5 8799,5137.5 8799,5084.5
  MidLayer2 w7: 8814.45,5106.13 8824.35,5106.13 ; 8814.45,5114.62 8824.35,5114.62
  MidLayer4 w5: 8811,4898.37 8839.91,4898.37 ; 8811,4898.37 8810.92,4887.77 8839.91,4898.37 ; 8811,4898.37 8810.92,4908.98 8839.91,4898.37 ; 8799,4872.5 8799,4925.5 8926,4925.5 8926,4872.5 8799,4872.5
  MidLayer4 w7: 8814.45,4894.13 8824.35,4894.13 ; 8814.45,4902.61 8824.35,4902.61
  MidLayer3 w5: 8811,4951.37 8810.92,4961.98 8839.91,4951.37 ; 8811,4951.37 8810.92,4940.77 8839.91,4951.37 ; 8811,4951.37 8839.91,4951.37 ; 8799,4925.5 8799,4978.5 8926,4978.5 8926,4925.5 8799,4925.5
  MidLayer3 w7: 8814.45,4947.13 8824.35,4947.13 ; 8814.45,4955.61 8824.35,4955.61
  Bottom Layer w5: 377.95,5645.67 387.01,5645.67 ; 477.95,5745.67 484.65,5745.67 ; 8811,4845.37 8839.91,4845.37 ; 8811,4845.37 8810.92,4834.77 8839.91,4845.37 ; 8811,4845.37 8810.92,4855.98 8839.91,4845.37 ; 8799,4819.5 8926,4819.5 8926,4872.5 8799,4872.5 8799,4819.5
  Bottom Layer w7: 8814.45,4841.13 8824.35,4841.13 ; 8814.45,4849.61 8824.35,4849.61
  Bottom Layer w15.75: v1(6953.36,5808.9) 6953.35,6174.79
  other v3: 129.92,43.31 2311.02,43.31 2610.24,43.31 4791.34,43.31 68.68,68.68 191.17,68.68 2249.78,68.68 2372.27,68.68 2548.99,68.68 2671.48,68.68 4730.09,68.68 4852.58,68.68 417.32,110.24 11614.17,110.24 43.31,129.92 216.54,129.92 2224.41,129.92 2397.64,129.92 2523.62,129.92 2696.85,129.92 4704.72,129.92 4877.95,129.92 356.08,135.61 478.57,135.61 11552.93,135.61 11675.42,135.61 68.68,191.17 191.17,191.17 2249.78,191.17 2372.27,191.17 2548.99,191.17 2671.48,191.17 4730.09,191.17 4852.58,191.17 330.71,196.85 503.94,196.85 11527.56,196.85 11700.79,196.85 129.92,216.54 2311.02,216.54 2610.24,216.54 4791.34,216.54 356.08,258.1 478.57,258.1 11552.93,258.1 11675.42,258.1 417.32,283.47 11614.17,283.47 5905.51,996.06 6984.25,996.06 5844.27,1021.43 5966.76,1021.43 6923.01,1021.43 7045.5,1021.43 5818.9,1082.68 5992.13,1082.68 6897.64,1082.68 7070.87,1082.68 5844.27,1143.92 5966.76,1143.92 6923.01,1143.92 7045.5,1143.92 5905.51,1169.29 6984.25,1169.29 1220.47,2496.06 3700.79,2496.06 1159.23,2521.43 1281.72,2521.43 3639.54,2521.43 3762.03,2521.43 1133.86,2582.68 1307.09,2582.68 3614.17,2582.68 3787.4,2582.68 1159.23,2643.92 1281.72,2643.92 3639.54,2643.92 3762.03,2643.92 1220.47,2669.29 3700.79,2669.29 5177.17,3074.8 8736.22,3074.8 5115.92,3100.17 5238.41,3100.17 8674.98,3100.17 8797.47,3100.17 5090.55,3161.42 5263.78,3161.42 8649.61,3161.42 8822.83,3161.42 5115.92,3222.66 5238.41,3222.66 8674.98,3222.66 8797.47,3222.66 5177.17,3248.03 8736.22,3248.03 417.32,3311.02 356.08,3336.39 478.57,3336.39 330.71,3397.64 503.94,3397.64 356.08,3458.88 478.57,3458.88 417.32,3484.25 1220.47,3826.77 3700.79,3826.77 1159.23,3852.14 1281.72,3852.14 3639.54,3852.14 3762.03,3852.14 1133.86,3913.39 1307.09,3913.39 3614.17,3913.39 3787.4,3913.39 1159.23,3974.63 1281.72,3974.63 3639.54,3974.63 3762.03,3974.63 1220.47,4000 3700.79,4000 5496.06,5192.91 8472.44,5192.91 5434.82,5218.28 5557.31,5218.28 8411.2,5218.28 8533.69,5218.28 5409.45,5279.53 5582.68,5279.53 8385.83,5279.53 8559.06,5279.53 5434.82,5340.77 5557.31,5340.77 8411.2,5340.77 8533.69,5340.77 5496.06,5366.14 8472.44,5366.14 417.32,6212.6 11614.17,6212.6 356.08,6237.97 478.57,6237.97 11552.93,6237.97 11675.42,6237.97 129.92,6279.53 2610.24,6279.53 4791.34,6279.53 330.71,6299.21 503.94,6299.21 11527.56,6299.21 11700.79,6299.21 68.68,6304.9 191.17,6304.9 2548.99,6304.9 2671.48,6304.9 4730.09,6304.9 4852.58,6304.9 356.08,6360.46 478.57,6360.46 11552.93,6360.46 11675.42,6360.46 43.31,6366.14 216.54,6366.14 2523.62,6366.14 2696.85,6366.14 4704.72,6366.14 4877.95,6366.14 417.32,6385.83 11614.17,6385.83 68.68,6427.39 191.17,6427.39 2548.99,6427.39 2671.48,6427.39 4730.09,6427.39 4852.58,6427.39 129.92,6452.76 2610.24,6452.76 4791.34,6452.76
  other v5: 10263.78,3401.58
  other v12: 1142.5,377.47 1141.52,456.21

## Polygon pours and split planes (outlines as drawn)
GND on Top Layer "MAIN-TL-Q4-GND" (solid, remove dead copper, pour order 1006): 11791.34,3562.99 11791.34,19.69 5905.51,19.69 5905.51,3562.99
GND on Top Layer "MAIN-TL-Q2-GND" (solid, remove dead copper, pour order 1005): 11811.02,6476.38 11811.02,3543.31 5905.51,3543.31 5905.51,6476.38
GND on Top Layer "MAIN-TL-Q1-GND" (solid, remove dead copper, pour order 1004): 19.69,6476.38 19.69,3543.31 5925.2,3543.31 5925.2,6476.38
AGND on Top Layer "1.2V-GND" (solid, remove dead copper, pour order 1000): 4013.68,1008.45 4803.68,1008.45 4803.68,1743.45 4013.68,1743.45
AGND on Top Layer "Top Layer-AGND" (solid, remove dead copper, pour order 1001): 4013.68,1008.45 4803.68,1008.45 4803.68,1743.45 4013.68,1743.45
SHIELD on Top Layer "USB-TL-SHIELD" (solid, pour order 1002): 7618.68,6464.57 7618.68,5437.01 8405.51,5437.01 8405.51,6464.57
GND on Top Layer "MAIN-TL-Q3-GND" (solid, remove dead copper, pour order 1007): 39.37,3562.99 39.37,19.69 5925.2,19.69 5925.2,3562.99
AUGND on Top Layer "AUDIO-TL-AUGND" (solid, pour order 1003): 4919.31,6480.42 4919.31,4645.77 2533.48,4645.77 2533.48,6480.42
GND on MidLayer1 "MAIN-ML1-Q4-GND" (solid, remove dead copper, pour order 1013): 11791.34,3562.99 11791.34,19.69 5905.51,19.69 5905.51,3562.99
GND on MidLayer1 "MAIN-ML1-Q2-GND" (solid, remove dead copper, pour order 1012): 11811.02,6476.38 11811.02,3543.31 5905.51,3543.31 5905.51,6476.38
1V2 on MidLayer1 "FPGAPWR-ML1-1V2" (solid, remove dead copper, pour order 1009): 9936.7,3826.46 9936.7,4000 10039.37,4000 10039.37,3822.84 10275.59,3822.84 10366.14,3732.28 10366.14,3492.13 10543.31,3492.13 10543.31,3393.7 10366.14,3393.7 10366.14,3157.48 10275.59,3066.93 10039.37,3066.93 10039.37,2889.76 9937.01,2889.76 9937.01,3066.93 9700.79,3066.93 9610.24,3157.48 9610.24,3393.7 9433.07,3393.7 9433.07,3496.06 9610.24,3496.06 9610.24,3740.16 9692.91,3822.84
GND on MidLayer1 "MAIN-ML1-Q3-GND" (solid, remove dead copper, pour order 1014): 3.68,3.45 3.68,3588.45 13.68,3598.45 58.68,3643.45 5958.68,3643.45 5958.68,3.45
AUGND on MidLayer1 "AUDIO-ML1-AUGND" (solid, remove dead copper, pour order 1010): 4921.26,6496.06 4921.26,5417.32 5334.65,5003.94 6185.04,5003.94 6185.04,4594.49 2527.56,4594.49 2527.56,6496.06
GND on MidLayer1 "MAIN-ML1-Q1-GND" (solid, remove dead copper, pour order 1011): 19.69,6476.38 19.69,3543.31 5925.2,3543.31 5925.2,6476.38
AGND on MidLayer1 "MidLayer1-AGND" (solid, remove dead copper, pour order 1008): 4013.68,1008.45 4803.68,1008.45 4803.68,1743.45 4013.68,1743.45
GND on MidLayer2 "MAIN-ML2-Q4-GND" (solid, remove dead copper, pour order 1020): 11791.34,3562.99 11791.34,19.69 5905.51,19.69 5905.51,3562.99
GND on MidLayer2 "MAIN-ML2-Q2-GND" (solid, remove dead copper, pour order 1019): 11811.02,6476.38 11811.02,3543.31 5905.51,3543.31 5905.51,6476.38
GND on MidLayer2 "MAIN-ML2-Q3-GND" (solid, remove dead copper, pour order 1021): -1.32,3.45 18.68,23.45 18.68,3618.45 5958.68,3618.45 5963.68,3623.45 5923.68,3583.45 5923.68,-11.55
GND on MidLayer2 "MAIN-ML2-Q1-GND" (solid, remove dead copper, pour order 1018): 19.69,6476.38 19.69,3543.31 5925.2,3543.31 5925.2,6476.38
AGND on MidLayer2 "MidLayer2-AGND" (solid, remove dead copper, pour order 1016): 4013.68,1008.45 4803.68,1008.45 4803.68,1743.45 4013.68,1743.45
AUGND on MidLayer2 "AUDIO-ML2-AUGND" (solid, pour order 1017): 4921.26,6496.06 4921.26,4661.42 2527.56,4661.42 2527.56,6496.06
2V5 on MidLayer2 "MidLayer2-2V5" (solid, pour order 1015): 9250,4100 9550,4100 9550,3900 9250,3900
GND on MidLayer4 "MAIN-ML3-Q4-GND" (solid, remove dead copper, pour order 1027): 11791.34,3562.99 11791.34,19.69 5905.51,19.69 5905.51,3562.99
GND on MidLayer4 "MAIN-ML3-Q1-GND" (solid, remove dead copper, pour order 1026): 11811.02,6476.38 11811.02,3543.31 5905.51,3543.31 5905.51,6476.38
GND on MidLayer4 "MidLayer3-GND" (solid, remove dead copper, pour order 1028): -1.32,3.45 -1.32,3573.45 5968.68,3573.45 5968.68,3.45
GND on MidLayer4 "MAIN-ML3-Q1-GND" (solid, remove dead copper, pour order 1025): 19.69,6476.38 19.69,3543.31 5925.2,3543.31 5925.2,6476.38
AGND on MidLayer4 "MidLayer3-AGND" (solid, remove dead copper, pour order 1022): 4013.68,1008.45 4803.68,1008.45 4803.68,1743.45 4013.68,1743.45
AUGND on MidLayer4 "AUDIO-ML3-AUGND" (solid, pour order 1024): 4921.26,6496.06 4921.26,4661.42 2527.56,4661.42 2527.56,6496.06
ADC_GND on MidLayer4 "BottomOverlay-ADC_GND" (solid, pour order 1023): 9250,550 9247.24,547.24 7953.6,547.24 7350,1150.84 7350,1650 7539.76,1650 7638.24,1748.48 7639.76,1750 8650,1750 8650,1550 8850,1350 8850,1300 8850,1150 8950,1050 9250,750 9250,650
GND on MidLayer3 "MAIN-ML4-Q4-GND" (solid, remove dead copper, pour order 1034): 11791.34,3562.99 11791.34,19.69 5905.51,19.69 5905.51,3562.99
GND on MidLayer3 "MAIN-ML4-Q3-GND" (solid, remove dead copper, pour order 1035): 39.37,3562.99 39.37,19.69 5925.2,19.69 5925.2,3562.99
GND on MidLayer3 "MAIN-ML4-Q2-GND" (solid, remove dead copper, pour order 1033): 11811.02,6476.38 11811.02,3543.31 5905.51,3543.31 5905.51,6476.38
AUGND on MidLayer3 "AUDIO-ML4-AUGND" (solid, pour order 1031): 4921.26,6496.06 4921.26,4661.42 2527.56,4661.42 2527.56,6496.06
GND on MidLayer3 "MAIN-ML4-Q1-GND" (solid, remove dead copper, pour order 1032): 19.69,6476.38 19.69,3543.31 5925.2,3543.31 5925.2,6476.38
AGND on MidLayer3 "1V2 Regulator" (solid, remove dead copper, pour order 1029): 4013.68,1008.45 4013.68,1743.45 4803.68,1743.45 4803.68,1008.45
1V2 on MidLayer3 "FPGAPWR-ML1-1V2" (solid, remove dead copper, pour order 1030): 10725,4250 10725,2700 9200,2700 9200,4250
GND on Bottom Layer "MAIN-BL-Q4-GND" (solid, remove dead copper, pour order 1046): 11791.34,3562.99 11791.34,19.69 5905.51,19.69 5905.51,3562.99
GND on Bottom Layer "MAIN-BL-Q3-GND" (solid, remove dead copper, pour order 1045): 39.37,3562.99 39.37,19.69 5925.2,19.69 5925.2,3562.99
GND on Bottom Layer "MAIN-BL-Q2-GND" (solid, remove dead copper, pour order 1044): 11811.02,6476.38 11811.02,3543.31 5905.51,3543.31 5905.51,6476.38
GND on Bottom Layer "MAIN-BL-Q1-GND" (solid, remove dead copper, pour order 1043): 19.69,6476.38 19.69,3543.31 5925.2,3543.31 5925.2,6476.38
2V5 on Bottom Layer "Bottom Layer-2V5 3" (solid, remove dead copper, pour order 1036): 9418.68,4028.45 9418.68,3898.45 10558.68,3898.45 10558.68,4028.45
2V5 on Bottom Layer "Bottom Layer-2V5" (solid, remove dead copper, pour order 1038): 9403.68,2863.45 9538.68,2863.45 9538.68,4143.45 9403.68,4143.45
GND on Bottom Layer "FPGA-GND" (solid, remove dead copper, pour order 1041): 9555.12,3877.95 10421.26,3877.95 10421.4,3877.82 10421.4,3011.94 9555.25,3011.94 9555.12,3011.81
2V5 on Bottom Layer "Bottom Layer-2V5 1" (solid, remove dead copper, pour order 1037): 9403.68,2863.45 10568.68,2863.45 10568.68,2993.45 9403.68,2993.45
2V5 on Bottom Layer "Bottom Layer-2V5 2" (solid, remove dead copper, pour order 1039): 10568.68,2863.45 10438.68,2863.45 10438.68,4148.45 10683.68,4148.45 10683.68,3948.45 10568.68,3948.45
AUGND on Bottom Layer "AUDIO-BL-AUGND" (solid, remove dead copper, pour order 1042): 4921.26,6429.13 4921.26,4594.49 2346.46,4594.49 2346.46,6429.13
AGND on Bottom Layer "1V2 Regulator GND" (solid, remove dead copper, pour order 1040): 4013.68,1008.45 4803.68,1008.45 4803.68,1743.45 4013.68,1743.45
no net on Top Overlay "Boundary-No Net" (solid): 145,5969 268,5931 145,5893 156,5918 44,5918 44,5944 156,5944 145,5969
no net on Top Overlay "Boundary-No Net" (solid): 11642.26,5969.39 11765.26,5931.39 11642.26,5893.39 11653.26,5918.39 11541.26,5918.39 11541.26,5944.39 11653.26,5944.39 11642.26,5969.39
no net on Top Overlay "BottomOverlay-No Net" (solid, pour order 1047): 762.87,135 1004.87,135 1004.87,224
GND on GND (split plane): 369 vertices, not listed, extent 18.11,18.05 11792.91,6477.95
GND on GND (split plane): 5098.73,806.5 5100.73,805.67 5102.44,804.36 5103.75,802.65 5104.57,800.66 5104.85,798.52 5104.57,796.38 5103.75,794.39 5102.44,792.68 5100.73,791.37 5098.73,790.54 5096.6,790.26 5094.46,790.54 5092.47,791.37 5090.76,792.68 5089.44,794.39 5088.62,796.38 5088.34,798.52 5088.62,800.66 5089.44,802.65 5090.76,804.36 5092.47,805.67 5094.46,806.5 5096.6,806.78
3V3 on PWR (split plane): 291 vertices, not listed, extent 606.71,201.1 11506.9,5763.37
5V0 on PWR (split plane): 310 vertices, not listed, extent 18.11,18.11 11260.65,6477.95
SHIELD on PWR (split plane): 498 vertices, not listed, extent 809.1,18.05 11792.91,6477.95
5VUSW on PWR (split plane): 10959.25,5470.79 10970.25,5459.79 10973.3,5457.29 10976.77,5455.43 10980.54,5454.29 10984.46,5453.9 10988.38,5454.29 10990.42,5454.91 11260.65,5454.91 11260.65,5331.26 11260.65,5312.1 9607.1,5312.1 9607.1,5508.9 10921.14,5508.9
no net on PWR (split plane): 5098.73,806.5 5100.73,805.67 5102.44,804.36 5103.75,802.65 5104.57,800.66 5104.85,798.52 5104.57,796.38 5103.75,794.39 5102.44,792.68 5100.73,791.37 5098.73,790.54 5096.6,790.26 5094.46,790.54 5092.47,791.37 5090.76,792.68 5089.44,794.39 5088.62,796.38 5088.34,798.52 5088.62,800.66 5089.44,802.65 5090.76,804.36 5092.47,805.67 5094.46,806.5 5096.6,806.78
no net on Keep-Out Layer "MidLayer2-No Net" (solid, pour order 1048): 163 vertices, not listed, extent 4997.55,6140 7647,6496.06

## Keep-outs
Keep-Out Layer:
  rectangle: 8792,4812.5 8933,5249.5
  region: 11811.61,5856.42 11501.78,5856.42 11501.78,5634.92 11811.61,5634.92
  region: 10538.73,115.58 10519.19,111.58 10538.73,107.58 10538.73,115.58
  region: 10538.73,125.58 10519.19,121.58 10538.73,117.58 10538.73,125.58
  region: 10538.73,135.58 10519.19,131.58 10538.73,127.58 10538.73,135.58
  region: 10538.73,145.58 10519.19,141.58 10538.73,137.58 10538.73,145.58
  region: 10538.73,155.58 10519.19,151.58 10538.73,147.58 10538.73,155.58
  region: 10538.86,165.45 10519.32,161.45 10538.86,157.45 10538.86,165.45
  region: 10538.73,175.58 10519.19,171.58 10538.73,167.58 10538.73,175.58
  region: 10538.73,185.58 10519.19,181.58 10538.73,177.58 10538.73,185.58
  region: 10538.73,195.58 10519.19,191.58 10538.73,187.58 10538.73,195.58
  region: 10538.67,205.58 10519.14,201.58 10538.67,197.58 10538.67,205.58
  region: 10047.28,115.58 10066.81,111.58 10047.28,107.58 10047.28,115.58
  region: 10047.28,125.58 10066.81,121.58 10047.28,117.58 10047.28,125.58
  region: 10047.28,135.58 10066.81,131.58 10047.28,127.58 10047.28,135.58
  region: 10047.28,145.58 10066.81,141.58 10047.28,137.58 10047.28,145.58
  region: 10047.28,155.58 10066.81,151.58 10047.28,147.58 10047.28,155.58
  region: 10047.15,165.45 10066.68,161.45 10047.15,157.45 10047.15,165.45
  region: 10047.28,175.58 10066.81,171.58 10047.28,167.58 10047.28,175.58
  region: 10047.28,185.58 10066.81,181.58 10047.28,177.58 10047.28,185.58
  region: 10047.28,195.58 10066.81,191.58 10047.28,187.58 10047.28,195.58
  region: 10047.33,205.58 10066.87,201.58 10047.33,197.58 10047.33,205.58
  lines w8: 4997.55,6496.02 4997.55,6417.32 ccw(c5026.43,6417.32) 5026.43,6388.44 ; 5026.47,6388.44 5076.48,6388.44 5076.48,6338.63 ; 5076.48,6338.58 ccw(c5144.74,6338.58) 5212.99,6338.58 5212.99,6388.44 ; 5213.44,6388.44 cw(c5213.44,6377.95) 5223.92,6377.99 5223.92,6169.29 ccw(c5252.81,6169.29) 5281.69,6169.29 5281.69,6377.95 cw(c5292.18,6377.95) 5292.18,6388.44 5981.15,6388.44 cw(c5981.15,6377.95) 5991.64,6377.95 5991.64,6169.29 ccw(c6020.52,6169.29) 6049.4,6169.24 ; 6049.4,6169.29 6049.4,6377.95 cw(c6059.89,6377.95) 6059.89,6388.44 ; 6060.34,6338.58 ccw(c6128.59,6338.58) 6196.85,6338.58 6196.85,6388.44 6447.7,6388.44 6447.7,6338.63 ; 6060.34,6338.63 6060.34,6388.44 ; 6447.7,6338.58 ccw(c6515.95,6338.58) 6584.2,6338.58 6584.2,6388.44 ; 6584.65,6388.44 cw(c6584.65,6377.95) 6595.14,6377.99 6595.14,6169.29 ccw(c6624.02,6169.29) 6652.9,6169.29 6652.9,6377.95 cw(c6663.39,6377.95) 6663.39,6388.44 7352.37,6388.44 cw(c7352.37,6377.95) 7362.85,6377.95 7362.85,6169.34 ccw(c7391.74,6169.29) 7420.62,6169.29 7420.62,6377.95 cw(c7431.11,6377.95) 7431.11,6388.44 ; 7431.56,6338.58 ccw(c7499.81,6338.58) 7568.06,6338.58 7568.06,6388.44 7618.07,6388.44 ccw(c7618.11,6417.32) 7647,6417.32 ; 7431.56,6338.63 7431.56,6388.44 ; 7647,6417.37 7647,6496.06
  lines w19.68: 11801.29,5634.92 11501.78,5634.92 11501.78,5856.42 11801.45,5856.42
  lines w20: 1052.94,0.46 0.46,0.46 0.46,6495.61 11810.57,6495.61 11810.57,0.45 2132.88,0.45 ; 1053.39,0 ccw(c1053.39,78.74) 1132.13,78.74 1132.13,123.45 2053.68,123.45 2053.68,78.74 ccw(c2132.42,78.74) 2132.42,0

## Other copper
Top Layer:
  rectangle net GND: 10508,95 10550,215
  rectangle net GND: 10035,99 10077,219
  rectangle: 6747.21,6233 6831.77,6379
  rectangle net NetJ7_4: 6856.47,6233 6941.02,6379
  rectangle net GND: 6965.72,6233 7050.27,6379
  rectangle net CAN#.CAN_L: 7074.97,6233 7159.53,6379
  rectangle: 7184.22,6233 7268.78,6379
  rectangle net RS232#.DCD: 5813.01,6233 5897.57,6379
  rectangle net RS232#.RXD: 5703.76,6233 5788.31,6379
  rectangle net RS232#.TXD: 5594.5,6233 5679.06,6379
  rectangle net RS232#.DCD: 5485.25,6233 5569.81,6379
  rectangle net GND: 5376,6233 5460.56,6379
  region net SHIELD: 7673.54,6144.98 7261.2,6144.98 7261.2,5937.4 7673.54,5937.4
  region net SHIELD: 7673.54,6388.98 7569.54,6388.98 7569.54,5966.98 7673.54,5966.98
  rectangle net SHIELD: 6342.21,5966.98 6446.21,6388.98
  region net SHIELD: 6302.33,6388 6198.33,6388 6198.33,5966 6302.33,5966
  rectangle net SHIELD: 4971,5966 5075,6388
  rectangle net 5VUSW: 10250,5373 10348,5506
  rectangle net GND: 2619.56,5928.28 2656.69,6013.17
  region: 8912,5243.5 8912,5190.5 8926,5190.5 8926,5243.5
  rectangle net 5VUSW: 9643,5304 9741,5439
  region net 5V0: 1171.93,3683.87 1171.93,3709.07 1090.35,3709.07 1090.35,3683.87
  rectangle net SHIELD: 820,190 980,230
  rectangle net GND: 4310,1610 4390,1680
  rectangle net GND: 4590,1030 4680,1250
  rectangle net 5V0: 5950,2710 6040,2770
  rectangle net 5V0: 6000,2430 6040,2770
  rectangle net VCCX: 7890,2000 7960,2160
  region net 5V0: 585.89,1329.49 585.89,1364 485,1364 485,1329.49
  rectangle net 3V3: 887.52,3810 912.72,4530
  rectangle net 3V3: 710,5020 735.2,5120
  rectangle net 3V3: 709.76,5200 734.96,5360
  rectangle net 5V0: 2200,5930 2410,6020
  rectangle net 5V0: 10970,5770 11180,5930
  rectangle net 3V3: 7850,3850 7920,3940
  rectangle net 9V0: 7500,2850 7600,2950
  rectangle net 3V3: 6851.54,2045.15 6876.73,2115.15
  rectangle net 1V2: 912.6,3242.68 937.8,3324.25
  rectangle net 1V8: 814.17,3242.68 839.37,3324.25
  rectangle net 2V5: 715.75,3242.68 740.94,3324.25
  rectangle net 3V3: 617.32,3242.68 642.52,3324.25
  rectangle net 3V3: 2930.32,3965.12 2955.51,4046.69
  rectangle net 2V5: 2733.46,3965.12 2758.66,4046.69
  rectangle net 1V2: 2635.04,3965.12 2660.24,4046.69
  rectangle net 5V0: 2536.61,3965.12 2561.81,4046.69
  rectangle net 1V2: 2418.5,3758.43 2443.7,3840
  rectangle net 2V5: 2221.65,3758.43 2246.85,3840
  rectangle net 5V0: 2123.23,3758.43 2148.43,3840
  rectangle net 3V3: 2024.8,3758.43 2050,3840
  rectangle net 5V0: 4300,1100 4400,1270
  rectangle net 3V3: 2100,2020 2150,2150
  rectangle net 3V3: 810,930 940,980
  rectangle net 2V5: 860,1570 910,1760
  rectangle net 3V3: 970,2080 1080,2180
  rectangle net 3V3: 2490,1180 2640,1230
  rectangle net 5V0: 3090,1670 3250,1750
  rectangle net 1V2: 3770,1750 3930,1940
  rectangle net 5V0: 9980,5570 10090,5780
  rectangle net 5V0: 1768.68,3985 1870,4125
  rectangle net GND: 1573.68,3980 1675,4120
  rectangle net 3V3: 1378.68,3980 1480,4120
  rectangle net VCCX: 2248.68,1484.4 2868.68,2195.2
  rectangle net GND: 23.68,1477 643.68,2206.4
  rectangle net GND: 1143.68,1481.7 1763.68,2204.6
  rectangle net DIPSW.D0: 11357.68,96.08 11422.68,188.08
  rectangle net DIPSW.D1: 11257.68,96.08 11322.68,188.08
  rectangle net DIPSW.D2: 11157.68,96.08 11222.68,188.08
  rectangle net DIPSW.D3: 11057.68,96.08 11122.68,188.08
  rectangle net DIPSW.D4: 10957.68,96.08 11022.68,188.08
  rectangle net DIPSW.D5: 10857.68,96.08 10922.68,188.08
  rectangle net DIPSW.D6: 10757.68,96.08 10822.68,188.08
  rectangle net DIPSW.D7: 10657.68,96.08 10722.68,188.08
  rectangle net GND: 502.01,3133.86 521.67,3161.66
  rectangle net GND: 470.51,3133.86 490.18,3161.66
  rectangle net GND: 439.02,3133.86 458.68,3161.66
  region net GND: 970.8,5428.45 970.8,4549 2281.17,4549 2281.17,5428.45
  rectangle net SHIELD: 10091,89 10495,228
  rectangle net AUGND: 3952.76,4755.91 4287.4,5338.58
  region net 5V0: 4278.61,5469.59 4225.42,5469.59 4225.42,5375.42 4278.61,5375.42
  rectangle net VCCX: 7923.34,1202.49 7981.26,1274.2
  region net GND: 6488.19,1373.71 6464.1,1373.71 6464.1,1271.65 6488.19,1271.65
  rectangle net SHIELD: 6342.45,5937.4 6754.79,6144.98
  region net SHIELD: 6302.33,6144.98 5889.99,6144.98 5889.99,5937.4 6302.33,5937.4
  rectangle net SHIELD: 4971.24,5937.4 5383.58,6144.98
  pour cut-out: 11180,2262.5 11510,2262.5 11510,1902.5 11180,1902.5
  pour cut-out: 11050,4510 11240,4510 11240,4260 11050,4260
  pour cut-out: 9460,3980 10520,3980 10520,2920 9460,2920
  pour cut-out: 7874.02,5185.04 7877.95,4905.51 8153.54,4905.51 8149.61,5185.04
  region: 11807.09,1011.81 11732.28,937.01 11732.28,381.89 11807.09,307.09
  region: 11809.8,2126.52 11735,2201.33 11735,2756.45 11809.8,2831.25
  region: 11809.8,3630.47 11735,3705.28 11735,4260.39 11809.8,4335.2
  region: 1822.84,6496.06 1897.64,6421.26 2452.76,6421.26 2527.56,6496.06
  text "TL" at 8850.5,5199.5 h35
MidLayer1:
  region: 8912,5190.5 8912,5137.5 8926,5137.5 8926,5190.5
  rectangle net 1V2: 9319,3879 9392,4110
  rectangle net 1V2: 9319,4043 9562,4110
  rectangle net 9V0: 7363.68,2798.45 7743.68,3088.45
  region net GND: 970.8,5426.84 970.8,4549 2281.17,4549 2281.17,5426.84
  rectangle net AUGND: 3965.55,4765.75 4274.61,5326.77
  rectangle net VCCX: 2228,1458 2873.68,2189
  rectangle net GND: 17,1458 643.68,2208
  rectangle net GND: 1118,1458 1763.68,2189
  text "L1" at 8850.5,5146.5 h35
MidLayer2:
  region: 8912,5137.5 8912,5084.5 8926,5084.5 8926,5137.5
  rectangle net 2V5: 48,3125 309,3433
  rectangle net 2V5: 48,3478 309,3693
  rectangle net 2V5: 48,3428 129,3556
  rectangle net 2V5: 167,3433 205,3567
  rectangle net 2V5: 242,3433 309,3604
  region net GND: 970.8,5426.84 970.8,4549 2281.17,4549 2281.17,5426.84
  rectangle net AUGND: 3965.55,4765.75 4274.61,5326.77
  rectangle net VCCX: 2228,1458 2873.68,2208
  rectangle net GND: 17,1458 643.68,2208
  rectangle net GND: 1118,1458 1763.68,2208
  text "L2" at 8850.5,5093.5 h35
MidLayer4:
  region: 8912,4925.5 8912,4872.5 8926,4872.5 8926,4925.5
  rectangle net 1V2: 9968,4035 10154,4121
  rectangle net GND: 1118,1458 1763.68,2208
  rectangle net 5V0: 5952.6,2403.01 6292.18,2764
  rectangle net AUGND: 3965.55,4765.75 4274.61,5326.77
  region net GND: 970.8,5426.84 970.8,4549 2281.17,4549 2281.17,5426.84
  rectangle net GND: 17,1458 643.68,2208
  rectangle net VCCX: 2228,1458 2873.68,2208
  rectangle net 9V0: 7363.68,2798.45 7657.6,3088.45
  text "L4" at 8850.5,4881.5 h35